# Altium PCB MB.PcbDoc (part 10 of 10)
Units mm, origin at the board's own origin, x right, y up, seen from the top; angles counter-clockwise.
Board outline 203 x 72 mm, 6 copper layers (Top Layer, Layer 3, Layer 1, Layer 2, Layer 4, Bottom Layer), stack 1.52 mm thick; 653 components, 568 nets, 2914 pads, 2399 vias.
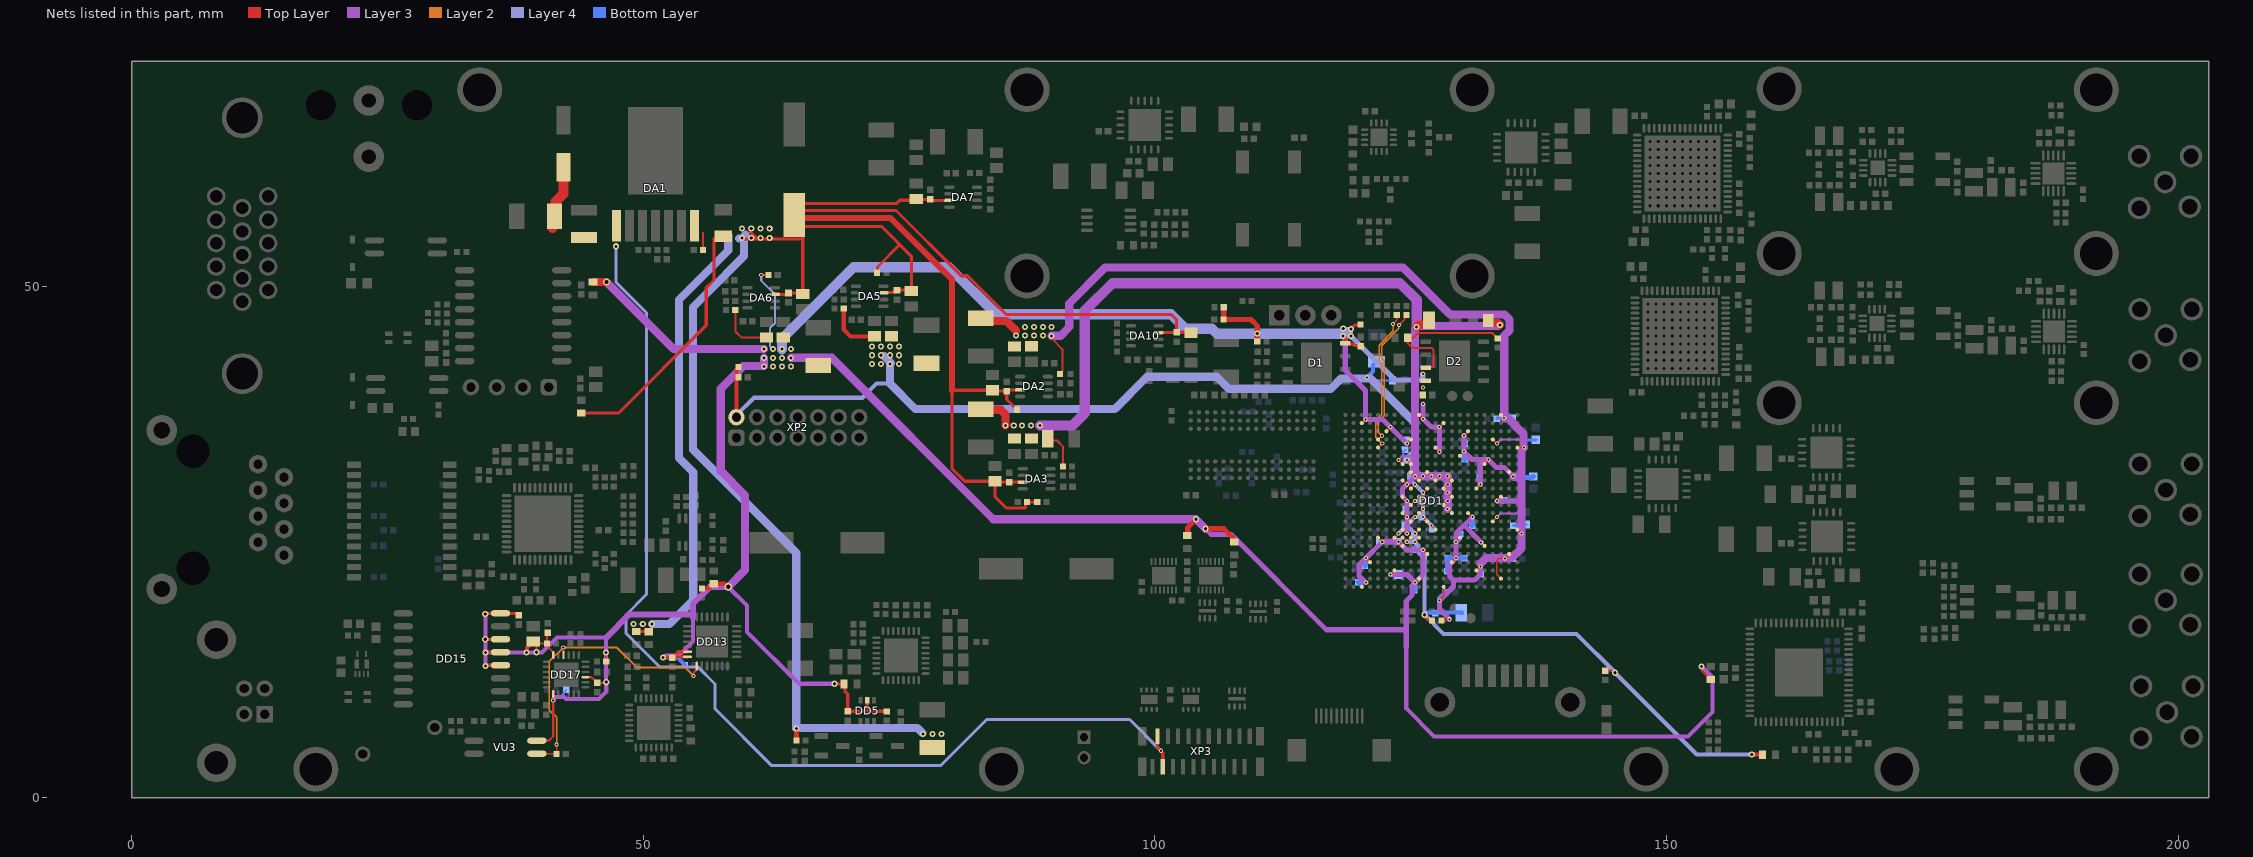
[diagram p13: the nets of this part, all layers, seen from the top]

## Via types
v1: diameter 0.8, hole 0.4, Top Layer to Bottom Layer, tented both sides, 1127 vias
v2: diameter 0.4, hole 0.2, Top Layer to Bottom Layer, tented both sides, 627 vias
v3: diameter 0.6, hole 0.3, Top Layer to Bottom Layer, tented both sides, 348 vias
v4: diameter 0.8, hole 0.4, Top Layer to Bottom Layer, 92 vias
v5: diameter 0.7, hole 0.4, Top Layer to Bottom Layer, tented both sides, 90 vias
v6: diameter 0.9, hole 0.5, Top Layer to Bottom Layer, 45 vias
v7: diameter 0.66, hole 0.4, Top Layer to Bottom Layer, 25 vias
v8: diameter 0.7, hole 0.3, Top Layer to Bottom Layer, 22 vias
v9: diameter 0.5, hole 0.2, Top Layer to Bottom Layer, 12 vias
v10: diameter 0.5, hole 0.3, Top Layer to Bottom Layer, 5 vias
v11: diameter 1, hole 0.5, Top Layer to Bottom Layer, 2 vias
v12: diameter 0.4, hole 0.2, Top Layer to Bottom Layer, 2 vias
v13: diameter 0.9, hole 0.4, Top Layer to Bottom Layer, tented both sides, 2 vias

## Nets (pads, with @x,y where several pads share a name; then routed paths per layer and width w, separated by ;. In a path a pad name is that pad's centre, name@x,y a point inside that pad or via, vN(x,y) a via of type N, cw(c..) or ccw(c..) an arc to the next point about the centre after c; other vN are vias at no path point) (continued)
VBUS_ISO: DD13.8 DD17.16 R168.2 VU3.3 | length 28.9
  Top Layer w0.125: VU3.3@39.6,4.315 41.51,4.315 R168.2@41.525,4.3 v2(41.525,5.2)
  Top Layer w0.2: v2(42.175,14.675) 42.194,14.656 42.194,13.956 DD17.16@42.2,13.95 ; v2(54.9,11.925) 54.938,11.963 54.938,12.25 55.225,12.536 DD13.8@55.225,12.875
  Layer 2 w0.125: v2(41.525,5.2) 41.525,7.875 40.825,8.575 40.825,13.325 v2(42.175,14.675)
  Layer 2 w0.2: v2(42.175,14.675) 42.19,14.69 47.41,14.69 49.35,12.75 54.075,12.75 v2(54.9,11.925)
VCC_5V0: C1.2 C2.2 C4.2 C8.2 C9.2 C10.2 C11.2 C12.2 C14.1 C15.2 C16.2 C17.2 C87.2 C88.2 DA1.7 DA2.3 DA3.3 DA5.3 DA6.3 DA7.3 DA10.3 L3.1 L10.1 L49.1 L62.1 R1.2 R2.2 R4.1 R6.2 R44.2 R49.1 | length 325.2
  Top Layer w0.2: R1.2@55.83,53.546 55.83,55.18 55.85,55.2
  Top Layer w0.3: L10.1@43.942,37.597 47.572,37.597 56.15,46.175 56.15,49.85 56.9,50.6 56.9,54.675 ; L3.1@49.3,16.235 50.52,16.235 L49.1@50.525,16.23 ; v3@59.8,54.625 62.35,54.625 65.3,54.625 ; 60.475,55.275 61.125,54.625 ; DA6.3@62.87,49.197 64.05,49.197 C16.2@64.187,49.334 65.493,49.334 C9.2@65.584,49.243 C14.1@65.584,55.05 ; C14.1@63.95,55.85 73.275,55.85 76.19,52.935 C8.2@76.19,49.52 76.099,49.611 C15.2@74.793,49.611 74.623,49.441 74.291,49.441 74.225,49.375 73.841,49.375 73.815,49.349 DA5.3@73.476,49.349 ; R2.2@72.849,51.31 72.884,51.345 72.884,51.884 75.038,54.037 ; C10.2@76.414,58.275 C10.2@76.539,58.4 ; C10.2@76.663,58.524 C10.2@76.539,58.4 ; C10.2@76.694,58.493 C17.2@78.06,58.493 78.17,58.383 DA7.3@79.905,58.383 ; R49.1@86.525,37.925 85.515,38.935 C11.2@85.515,39.739 ; DA2.3@86.832,39.874 85.65,39.874 C11.2@85.515,39.739 ; DA3.3@87.086,30.857 85.777,30.857 C12.2@85.769,30.849 84.463,30.849 C4.2@84.372,30.94 ; R4.1@88.494,28.896 R6.2@87.489,28.896 87.368,28.775 87.368,28.38 87.313,28.325 85.475,28.325 84.372,29.428 C4.2@84.372,30.94 ; DA10.3@100.348,45.466 102.095,45.466 C88.2@102.126,45.497 ; C87.2@103.523,45.454 103.48,45.497 C88.2@102.126,45.497 ; C10.2@76.539,58.4 75.075,58.4 74.775,58.1 65.65,58.1 64.75,57.2 C14.1@64.75,56.95 65.2,57.4 74.7,57.4 81.075,51.025 81.675,51.025 85.45,47.25 101.57,47.25 102.126,46.694 C88.2@102.126,45.497 ; C4.2@84.372,30.94 81.41,30.94 80.175,32.175 80.175,39.83 C1.2@84.118,39.83 84.209,39.739 C11.2@85.515,39.739
  Top Layer w0.5: v3(64.95,6.775) 64.955,6.77 R44.2@64.955,5.588
  Top Layer w0.6: C14.1@64.75,56.95 65.025,56.675 74.15,56.675 80.175,50.65 80.175,39.83
  Layer 4 w0.5: v3@77.275,6.325 77.275,6.3 77.325,6.25 v3(77.35,6.25)
  Layer 4 w0.8: v3(50.85,16.975) 52.55,16.975 54.845,19.27 ; 54.845,34.023 54.845,47.945 56.25,49.35 59.831,52.931 v3@59.831,54.881 ; 54.85,34.023 64.95,23.923 v3(64.95,6.775) ; 58.325,54.95 58.3,54.925 58.3,53.5 53.475,48.675 53.475,33.225 54.845,31.855 ; 59.35,54.65 v3(59.65,54.725) ; v3@59.662,54.713 v3@59.831,54.881 ; 60,55.05 v3@59.831,54.881 ; v3@65.027,6.825 76.775,6.825 v3@77.275,6.325 ; 54.845,19.27 54.85,19.275 ; 54.845,19.27 54.845,31.855 ; 54.845,31.855 54.85,31.85 ; 54.85,19.275 54.875,19.3 54.875,31.825 54.85,31.85 ; 54.85,19.275 54.85,31.85
  other v3: 78.25,6.25 79.15,6.25 49.05,16.975 49.95,16.975 60.55,54.725 61.45,54.725 62.35,54.725 59.65,55.625 60.55,55.625 61.45,55.625 62.35,55.625
VCC_IN: C3.1 C6.2 DA1.1 L58.2 XP3.2 XP3.3 | length 111.6
  Top Layer w0.3: XP3.2@100.261,6.034 100.261,4.914 v2(100.575,4.6) 100.575,4.573 100.761,4.387 XP3.3@100.761,3.034
  Top Layer w1: L58.2@41.132,55.705 41.132,56.85 41.45,57.168 41.45,58.275 42.2,59.025 C3.1@42.2,61.625
  Layer 4 w0.3: v3(47.325,53.9) 47.325,50.4 50.3,47.425 50.3,19.875 48.3,17.875 48.3,16.075 51.575,12.8 55.325,12.8 57,11.125 57,8.7 62.55,3.15 79.05,3.15 83.55,7.65 97.525,7.65 v2(100.575,4.6)
VDD_1V0: C31.2 C37.2 C42.2 C45.2 C47.2 C49.2 C51.2 C53.2 C55.2 C56.2 C60.2 C61.2 C63.2 DD1.G8 DD1.H9 DD1.H11 DD1.J8 DD1.J10 DD1.J12 DD1.J14 DD1.K13 DD1.L8 DD1.L14 DD1.M13 DD1.N8 DD1.N14 DD1.R8 L2.2 R9.2 | length 110.4
  Top Layer w0.2: C42.2@89.525,35.1 89.7,34.925 90.425,34.925 91.022,34.328 R9.2@91.022,32.394 ; v2(123.811,33.026) DD1.G8@124.212,32.625 ; DD1.R8@124.212,26.225 v2(124.613,25.824) ; DD1.N8@124.212,27.825 v2(124.613,27.424) ; DD1.L8@124.212,29.425 v2(124.613,29.024) ; DD1.J8@124.212,31.025 v2(124.613,30.624) ; DD1.H9@125.012,31.825 v2(125.413,31.424) ; DD1.J10@125.812,31.025 v2(126.213,31.426) ; DD1.H11@126.612,31.825 v2(127.013,31.424) ; DD1.J12@127.412,31.025 v2(127.813,31.426) ; DD1.M13@128.212,28.625 v2(128.613,29.026) ; DD1.K13@128.212,30.225 v2(128.613,30.626) ; v2(128.611,28.226) DD1.N14@129.012,27.825 ; v2(128.611,29.826) DD1.L14@129.012,29.425 ; v2(128.611,31.426) DD1.J14@129.012,31.025
  Top Layer w0.8: L2.2@82.975,37.985 83.041,37.919 84.931,37.919 85.4,37.45 v3(85.4,36.375) ; v3(125.576,46.024) 125.777,46.225 126.6,46.225 126.775,46.4 C45.2@126.775,46.675 ; C49.2@132.575,46.65 132.575,46.5 132.675,46.4 133.525,46.4 v3(133.7,46.225)
  Layer 3 w0.2: v2(123.811,33.026) 123.813,33.026 124.212,33.425 125.298,33.425 125.413,33.31
  Layer 3 w0.5: v2(124.613,25.824) v2(124.613,27.424) v2(124.613,29.024) 124.175,29.462 124.175,30.185 v2(124.613,30.624) v2(125.413,31.424)
  Layer 3 w0.6: v2@128.611,29.024 v2(128.613,29.026) ; v2(128.611,31.426) v2@128.613,31.424
  Layer 3 w0.8: 125.4,38.2 125.4,45.848 v3(125.576,46.024) ; 125.413,38.187 125.413,33.31 v2(125.413,31.424) v2@126.211,31.424 ; v3@125.576,46.101 133.576,46.101 v3(133.7,46.225) ; v2@126.216,31.424 v2(127.013,31.424) ; v2@127.013,31.426 v2(127.813,31.426) v2(128.611,31.426) ; v2(128.611,28.226) v2@128.611,29.024 ; v2(128.613,29.026) v2(128.613,30.626) v2@128.613,31.424
  Layer 3 w1: v3(88.775,36.375) 91.925,36.375 93.15,37.6 93.15,47.6 95.85,50.3 123.95,50.3 125.576,48.674 v3@125.576,46.101
  Bottom Layer w0.2: v2(123.811,33.026) 124.305,33.521 124.305,33.815 C63.2@124.49,34
  Bottom Layer w0.3: C60.2@124.49,28.215 124.613,28.092 v2(124.613,27.424) ; C56.2@124.494,26.65 124.613,26.531 v2(124.613,25.824)
  other v3: 86.2,36.375 87,36.375 87.875,36.375
VDD_1V8: C33.2 C39.2 C48.2 C50.2 C57.2 C59.2 C62.2 C64.2 C69.2 DD1.G9 DD1.K9 DD1.K11 DD1.L10 DD1.M9 DD1.N10 DD1.P9 DD1.P11 DD1.R10 DD1.R12 DD1.T7 DD1.T8 DD1.T9 DD1.T10 L4.2 L8.1 L46.1 R13.2 R20.1 R21.1 R23.2 R24.1 R25.1 XP2.2 | length 169.7
  Top Layer w0.2: DD1.T7@123.412,25.425 v2(123.813,25.826) ; DD1.T8@124.176,25.425 DD1.T8@124.212,25.425 v2@124.613,25.024 ; v2(124.611,25.024) DD1.T9@125.012,25.425 ; v2@124.611,33.025 DD1.G9@125.012,32.625 ; DD1.P9@125.012,27.025 v2(125.413,27.426) ; DD1.M9@125.012,28.625 v2(125.413,29.026) ; DD1.K9@125.012,30.225 v2(125.413,30.626) ; v2(125.411,25.024) DD1.T10@125.812,25.425 ; v2(125.411,25.824) DD1.R10@125.812,26.225 ; DD1.N10@125.812,27.825 v2(126.213,28.226) ; DD1.L10@125.812,29.425 v2(126.213,29.024) ; v2(126.211,27.426) DD1.P11@126.612,27.025 ; v2(126.211,29.824) DD1.K11@126.612,30.225 ; v3(126.332,17.895) 126.408,17.818 126.408,17.586 126.592,17.403 126.997,17.403 R24.1@127.075,17.325 ; v2(127.011,26.626) DD1.R12@127.412,26.225 ; R23.2@144,12.425 144.642,12.425 144.842,12.225 v3(144.95,12.225)
  Top Layer w0.4: XP2.2@59.1,37.2 59.1,41.9 R21.1@59.3,42.1 ; R13.2@69.586,47.812 69.586,45.764 70.251,45.099 C39.2@72.595,45.099 ; v3(158.326,4.225) L46.1@159.375,4.225
  Layer 4 w0.4: XP2.2@59.1,37.2 59.1,37.4 60.8,39.1 71.425,39.1 72.8,40.475 74.1,40.475 ; v2@123.813,25.821 v2(123.813,25.826) 124.613,26.626 ; v2(124.611,25.024) v2(125.411,25.024) ; v2(124.611,33.025) 125.113,32.522 125.113,31.957 124.829,31.673 124.829,31.211 v2(125.413,30.626) 126.211,29.829 v2(126.211,29.824) v2(126.211,27.426) ; v2(125.413,29.026) 125.416,29.024 v2(126.213,29.024) ; v2(127.011,26.626) v2(126.211,27.426) ; v3(158.326,4.225) 152.95,4.225 v3(144.95,12.225) 144.95,12.275 141.2,16.025 128.201,16.025 v3(126.332,17.895) 126.332,23.402 125.713,24.021 125.713,24.722 v2(125.411,25.024) ; 124.613,26.626 v2(125.413,27.426) v2(126.211,27.426) ; 124.613,26.626 125.411,25.829 v2(125.411,25.824) v2(125.411,25.024)
  Layer 4 w0.8: 73.538,43.162 v3@74.2,42.5 ; v3(74.1,42.4) 74.1,40.475 76.575,38 96.075,38 99.225,41.15 106.075,41.15 107.25,39.975 117.182,39.975 118.182,40.975 121.075,40.975 125.4,36.65 125.4,33.814 v2(124.611,33.025)
  Bottom Layer w0.2: v2(120.725,41.1) 121.025,40.8 L8.1@123.195,40.8
  Bottom Layer w0.4: v2(120.725,41.1) 121.309,41.684 121.309,42.284 C48.2@121.65,42.625 ; v2(125.411,25.024) 125.51,24.924 C62.2@125.51,24.225 ; v3(126.332,17.895) 126.386,17.895 126.597,18.106 129.994,18.106 C50.2@130.025,18.075
  other v3: 72.35,42.4 73.225,42.4 74.975,42.4 72.35,43.25 73.225,43.25 74.1,43.25 74.975,43.25 72.35,44.1 73.225,44.1 74.1,44.1 74.975,44.1
VDD_2V5: C30.2 C36.2 C134.2 C135.2 C138.2 C139.2 C142.2 C143.2 C145.2 C147.2 C148.2 C149.2 C150.2 C151.2 C152.2 C153.2 C154.2 C156.2 C157.2 C158.2 C159.2 C160.2 C161.2 DD1.A20 DD1.AA20 DD1.AB13 DD1.C16 DD1.D19 DD1.E22 DD1.F15 DD1.G18 DD1.H21 DD1.K17 DD1.L20 DD1.N16 DD1.P19 DD1.R22 DD1.T15 DD1.U18 DD1.V21 DD1.W14 DD1.Y17 L1.2 R7.2 R61.2 | length 157.6
  Top Layer w0.125: v2(127.817,19.292) 128.212,19.687 DD1.AB13@128.212,20.625 ; DD1.AA20@133.807,21.425 133.4,21.832 133.4,23.161 133.651,23.413 134.197,23.413 v2(134.211,23.399)
  Top Layer w0.2: v3(89.9,45.15) 89.9,44.9 90.95,43.85 90.95,41.728 90.922,41.7 90.922,41.611 R7.2@90.722,41.411 ; R61.2@128,17.325 128.621,17.325 128.746,17.45 v2(128.8,17.45) ; DD1.W14@129.012,23.025 v2(129.413,23.426) ; v2(129.425,25) 129.425,25.019 129.812,25.406 DD1.T15@129.812,25.425 ; DD1.F15@129.812,33.425 v2(130.213,33.826) ; v2@130.213,35.425 DD1.C16@130.612,35.825 ; DD1.N16@130.612,27.825 v2(131.013,27.424) ; DD1.Y17@131.412,22.225 v2(131.813,22.626) ; DD1.K17@131.412,30.225 v2(131.813,30.626) ; v2(131.885,24.952) DD1.U18@132.212,24.625 ; DD1.G18@132.212,32.625 132.212,32.643 132.613,33.045 v2(132.613,33.063) ; DD1.P19@133.012,27.025 v2(133.413,27.426) ; DD1.D19@133.012,35.025 v2(133.413,34.624) ; v2(133.411,29.024) DD1.L20@133.812,29.425 ; DD1.A20@133.812,37.425 v2(134.132,37.105) ; v2(134.211,23.399) 134.211,23.424 DD1.V21@134.612,23.825 ; DD1.H21@134.612,31.825 v2(135.013,31.424) ; DD1.R22@135.412,26.225 v2(135.813,25.824) ; DD1.E22@135.412,34.225 v2(136.075,34.225)
  Top Layer w0.8: L1.2@82.975,46.875 83.25,46.6 85.475,46.6 86.425,45.65
  Layer 3 w0.2: v2(133.413,27.426) 133.762,27.775 135.813,27.775 ; v2(133.413,34.624) 133.813,35.024 135.179,35.024 135.19,35.034 135.981,35.034 136.025,34.99
  Layer 3 w0.5: v2(128.8,17.45) 127.817,18.433 v2(127.817,19.292) 129.189,20.664 129.189,21.274 ; v2(130.213,35.424) v2(130.213,35.424) v2(130.213,33.826) 130.977,33.063 131.795,33.063 ; v2(131.013,27.424) 130.219,26.629 ; v2(131.813,22.626) 131.813,21.846 131.241,21.274 129.189,21.274 ; v2(131.813,30.626) 131.795,30.644 131.795,33.063 ; v2(131.885,24.952) 131.885,24.964 130.219,26.629 ; v2(133.411,29.024) 135.8,29.024 ; v2(135.013,31.424) 134.137,32.3 133.325,32.3 132.613,33.011 v2(132.613,33.063) 131.795,33.063 ; 129.189,21.274 128.775,21.687 128.775,22.788 v2(129.413,23.426) 129.413,24.988 v2(129.425,25) 129.425,25.835 130.219,26.629
  Layer 3 w0.8: v3(89.9,45.15) 90.775,45.15 91.625,46 91.625,48.325 95.125,51.825 124.25,51.825 128.85,47.225 134.181,47.225 134.65,46.756 134.65,45.675 134.132,45.157 v2(134.132,37.105) 134.495,37.105 136.025,35.575 136.025,34.99 v2@136.025,34.275 ; 131.813,22.88 132.357,23.424 134.186,23.424 v2(134.211,23.399) ; v2@134.211,23.424 134.856,23.424 135.813,24.381 v2(135.813,25.824) 135.813,27.775 135.813,33.963 v2(136.075,34.225) ; v2@135.062,31.375 135.733,31.375
  Bottom Layer w0.3: v2(131.813,22.626) 131.825,22.615 C134.2@131.825,21.87 ; C138.2@133.383,37.037 133.45,37.105 v2(134.132,37.105) 134.92,37.105 C142.2@134.95,37.135 ; C150.2@133.509,23.37 133.537,23.399 v2(134.211,23.399) 134.951,23.399 C143.2@134.98,23.37 ; C152.2@135.024,26.61 136.139,26.61 C160.2@136.25,26.72 ; 135.569,26.613 135.569,26.068 v2(135.813,25.824) ; v2(136.075,34.225) 136.075,34.94 C149.2@136.025,34.99 137.215,34.99 C161.2@137.225,35
  Bottom Layer w0.5: v2(127.817,19.292) 127.817,19.497 C153.2@128.413,20.092 ; C148.2@128.575,22.135 128.588,22.148 128.588,23.4 C135.2@128.6,23.413 128.614,23.426 v2(129.413,23.426) 130.216,23.426 C139.2@130.225,23.435 ; v2(129.425,25) 129.742,25.317 129.742,25.695 C147.2@129.812,25.765 ; v2(130.213,33.826) 130.213,33.147 C156.2@130.275,33.085 ; v2(130.213,35.424) 130.213,34.959 130.215,34.956 130.215,34.67 C159.2@130.285,34.6 ; C158.2@131,26.61 131.013,26.624 v2(131.013,27.424) ; C151.2@131.754,31.303 131.795,31.261 131.795,30.645 v2(131.813,30.626) ; v2(133.411,29.024) 133.752,29.024 133.759,29.03 134.045,29.03 C157.2@134.115,29.1 ; v2(135.013,31.424) 135.462,31.424 C154.2@135.825,31.061 136.079,31.315 136.877,31.315 C145.2@136.975,31.413
  other v3: 86.425,45.175 87.3,45.175 88.175,45.175 89.05,45.175 89.9,46 87.3,46.025 88.175,46.025 89.05,46.025
VDD_3V3: C5.2 C32.2 C34.2 C38.2 C40.2 C66.2 C68.2 C71.2 C75.2 C81.2 C111.2 C132.2 C133.2 C136.2 C140.2 C144.2 C327.2 C346.2 D1.8 D2.7 D2.8 DD1.A10 DD1.AA10 DD1.AB3 DD1.B3 DD1.B13 DD1.C6 DD1.D9 DD1.E12 DD1.T5 DD1.U8 DD1.V11 DD1.W4 DD1.Y7 DD5.5 DD13.6 DD13.7 DD15.12 DD15.13 DD15.14 DD15.16 DD17.1 DD17.9 DD17.18 L5.2 L9.1 L11.1 L12.1 L13.1 L17.1 L48.1 L60.1 R12.1 R15.2 R22.2 R26.1 R27.2 R28.2 R31.1 R32.1 R37.2 R160.2 R162.2 R163.2 R165.2 VU3.4 | length 439.1
  Top Layer w0.2: v3(39.575,14.225) 39.575,14.95 39.425,15.1 R165.2@40.575,15.1 ; VU3.4@39.6,5.585 40.785,5.585 41.2,6 v2(41.2,9.525) DD17.1@41.2,10.15 ; C111.2@40.65,16.14 40.575,16.065 R165.2@40.575,15.1 ; DD17.18@41.2,13.95 41.2,14.223 41.185,14.238 41.185,14.24 40.762,14.663 40.762,14.913 R165.2@40.575,15.1 ; DD17.9@44.35,11.8 44.875,11.8 44.95,11.725 45.01,11.725 C32.2@45.5,11.235 46.31,11.235 v3(46.375,11.3) ; R163.2@46.375,13.325 v3@46.375,14.175 ; R15.2@58.98,47.66 59,47.64 59,45.575 59.58,44.995 C40.2@62.036,44.995 ; v2(61.525,51.1) 61.537,51.112 R28.2@62.242,51.112 ; DD1.AB3@120.212,20.625 v2(120.613,21.026) ; DD1.B3@120.212,36.625 DD1.B3@120.212,36.625 120.575,36.986 v2(120.577,36.986) ; v2(120.611,23.426) DD1.W4@121.012,23.025 ; DD1.T5@121.81,25.423 v2(122.212,25.022) ; DD1.C6@122.612,35.825 v2(123.013,36.226) ; v2(123.011,21.824) DD1.Y7@123.412,22.225 ; v2(123.813,25.028) DD1.U8@124.214,24.627 ; v2(124.611,34.624) DD1.D9@125.012,35.025 ; v2(125.423,21.029) 125.812,21.418 DD1.AA10@125.812,21.425 ; DD1.A10@125.812,37.425 v2(126.213,37.024) ; v2(126.213,24.228) DD1.V11@126.614,23.827 ; D2.7@126.468,42.037 126.525,42.094 127.176,42.094 127.225,42.143 127.225,43.8 127.075,43.95 125.175,43.95 124.705,44.42 L9.1@124.705,44.95 125.238,44.95 125.713,45.425 132.97,45.425 R26.1@133.495,44.9 ; DD1.E12@127.412,34.225 v2(127.813,33.824) ; v2(127.811,36.224) DD1.B13@128.212,36.625 ; v3(153.425,12.85) 153.454,12.821 153.454,12.431 154.003,11.882 154.003,11.807 154.248,11.562 L48.1@154.323,11.562
  Top Layer w0.3: v3(34.55,15.5) 34.556,15.494 DD15.14@36.043,15.494 ; v3(34.55,17.975) 34.631,17.975 34.69,18.034 DD15.16@36.043,18.034 37.671,18.034 C346.2@37.846,17.859 ; v3(34.575,12.9) 34.629,12.954 DD15.12@36.043,12.954 ; v3(34.575,14.2) 34.599,14.224 DD15.13@36.043,14.224 ; v3(51.925,13.725) 51.94,13.71 C5.2@52.825,13.71 ; DD13.7@54.325,13.775 52.89,13.775 C5.2@52.825,13.71 ; DD13.6@54.325,14.275 53.39,14.275 C5.2@52.825,13.71 ; v3(68.675,11.15) 68.699,11.126 L60.1@69.605,11.126 69.693,11.038 69.693,10.432 69.977,10.148 C81.2@69.977,8.461 71.877,8.461 ; DD5.5@71.882,9.534 71.882,8.466 71.877,8.461 ; R37.2@73.787,8.451 73.777,8.461 71.877,8.461 ; v3(118.375,45.125) 118.6,44.9 D1.8@118.6,44.42 118.666,44.354 119.321,44.354 119.45,44.225 120.015,44.225 C66.2@120.125,44.115 ; v3@119.15,45.9 119.325,46.075 119.4,46.075 119.519,46.194 119.994,46.194 R12.1@120.075,46.275
  Top Layer w0.4: v3(38.6,14.2) 38.624,14.224 38.624,14.649 38.8,14.825 38.8,14.975 39.1,15.275 C327.2@39.25,15.275 ; R162.2@55.75,20.475 56.421,20.475 56.655,20.709 56.655,20.775 56.8,20.92 57.924,20.92 58.219,20.625 v5(58.3,20.625)
  Top Layer w0.5: L12.1@103.161,25.632 103.209,25.68 103.209,26.409 v3(104.025,27.225) ; v3(104.95,26.3) 106.725,26.3 107.563,25.462 107.563,25.084 107.658,24.989 L13.1@107.733,24.989 ; R32.1@106.725,47.95 106.725,46.766 R31.1@106.7,46.741 109.384,46.741 110,46.125 v3(110,45.363) R22.2@110,44.6
  Top Layer w0.8: L11.1@45.085,50.414 v5(46.389,50.414)
  Layer 3 w0.4: v3(34.55,17.975) 34.575,17.95 v3(34.575,14.2) ; v3(34.575,12.9) v3(34.575,14.2) ; v2(41.2,9.525) 41.2,9.603 41.434,9.838 42.27,9.838 42.457,9.65 45.675,9.65 46.375,10.35 v3(46.375,11.3) 46.36,11.315 v3(46.36,14.19) 46.36,15.66 41.56,15.66 40.1,14.2 v3(38.6,14.2) v3(34.575,14.2) ; v3(51.925,13.725) 51.979,13.725 52.179,13.925 53.475,13.925 54.85,15.3 54.85,17.625 ; v5(58.3,20.625) 60.15,18.775 60.15,16.2 65.2,11.15 v3(68.675,11.15) ; 124.561,14.709 124.561,8.714 127.275,6 152.1,6 154.475,8.375 154.475,11.8 v3(153.425,12.85)
  Layer 3 w0.5: v3(104.95,26.3) 105.5,25.75 107.425,25.75 116.75,16.425 124.561,16.425 ; 118.6,44.9 118.6,41.775 120.577,39.798 v2(120.577,36.986) 122.254,36.986 v2(123.013,36.226) 124.611,34.629 v2(124.611,34.624) ; v2(120.613,21.026) 119.95,21.69 119.95,22.766 v2(120.611,23.426) 120.616,23.426 v2(122.212,25.022) 123.806,25.022 v2(123.813,25.028) 124.613,24.228 v2(126.213,24.228) 126.213,21.818 v2(125.423,21.029) ; v2(123.011,21.824) 124.629,21.824 v2(125.423,21.029) ; 124.561,14.709 124.561,16.425 ; v2@126.213,38.472 v2(126.213,37.024) 127.014,36.224 v2(127.811,36.224) 127.813,36.221 v2(127.813,33.824) ; 124.561,16.425 124.561,19.249 125.137,19.825 125.137,20.743 v2(125.423,21.029)
  Layer 3 w0.6: 46.36,15.66 48.6,17.9 54.85,17.9 ; 54.85,17.625 54.85,18.95 56.525,20.625 v5(58.3,20.625)
  Layer 3 w0.8: v5(46.389,50.414) 52.953,43.85 v3(61.8,43.85) ; v5(58.3,20.625) 59.95,22.275 59.95,29.55 57.575,31.925 57.575,40 59.775,42.2 61.775,42.2 61.8,42.225 v3(61.8,43) ; v3(64.425,43) 68.425,43 84.2,27.225 v3(104.025,27.225) v3(104.95,26.3)
  Layer 4 w0.2: v2(61.525,51.1) 61.525,50.542 62.87,49.197 62.87,46.37 62.375,45.875 62.375,44.15 v3(62.675,43.85)
  Layer 4 w0.5: v3@119.15,45.075 119.225,45 119.275,45 123.45,40.825 126.175,40.825 v2(126.175,41.425)
  Layer 4 w1: v3(63.55,43.85) 63.55,44.858 70.542,51.85 79.875,51.85 84.475,47.25 95.027,47.25 101.57,47.25 102.97,45.85 105.573,45.85 106.06,45.363 v3(110,45.363) 118.713,45.363 118.875,45.525
  Bottom Layer w0.2: v2(41.2,9.525) 41.444,9.769 41.787,9.769 42.245,10.227 42.245,10.33 C38.2@42.465,10.55
  Bottom Layer w0.4: v3(51.925,13.725) 53.325,13.725 R160.2@54.075,12.975
  Bottom Layer w0.5: C136.2@119.858,21.082 119.914,21.026 v2(120.613,21.026) ; C132.2@120.519,22.686 120.589,22.756 120.589,23.027 120.611,23.049 v2(120.611,23.426) ; v2(123.011,21.824) 123.773,21.824 C144.2@123.775,21.825 ; C133.2@125.335,20.275 125.405,20.345 125.405,20.62 125.423,20.638 v2(125.423,21.029) ; v2(126.213,24.228) 126.215,24.226 126.215,23.595 C75.2@126.25,23.56
  other v2: 126.199,38.486 126.2,40.1
  other v3: 61.8,42.15 62.675,42.15 63.55,42.15 64.425,42.15 62.675,43 63.55,43 64.425,43.85 119.15,45.125 119.15,45.825 118.4,45.85
VMODE0: DD1.D5 R158.2 | length 13.8
  Top Layer w0.125: v2(123.85,46.2) 124.411,46.761 124.411,47.011 R158.2@124.575,47.175
  Top Layer w0.2: DD1.D5@121.812,35.025 v2(122.175,35.388)
  Layer 2 w0.125: v2(122.175,35.388) 121.812,35.75 121.812,36.789 122.387,37.364 122.387,42.714 122.162,42.939 122.162,44.186 123.85,45.874 v2(123.85,46.2)
VMODE1: DD1.E5 R159.2 | length 14.4
  Top Layer w0.125: v2(123.275,46.325) 123.625,46.675 R159.2@123.625,47.175
  Top Layer w0.2: DD1.E5@121.812,34.225 v2(122.213,34.626)
  Layer 2 w0.125: v2(122.213,34.626) 121.587,35.253 121.587,36.882 122.162,37.457 122.162,42.5 121.9,42.762 121.9,44.25 123.275,45.625 v2(123.275,46.325)
pads on no net: BQ1.2 BQ1.4 BQ2.2 BQ2.4 DA13.2 DA13.4 DA13.5 DA13.6 DA13.9 DA13.10 DA14.18 DA15.18 DA16.2 DA16.4 DA16.5 DA16.6 DA16.9 DA16.10 DA17.2 DA17.4 DA17.5 DA17.6 DA17.9 DA17.10 DA18.6 DA18.7 DA19.6 DA19.7 DA20.2 DA20.4 DA20.5 DA20.6 DA20.8 DA20.9 DA20.11 DA20.12 DA21.2 DA21.4 DA21.5 DA21.6 DA21.9 DA21.10 DD1.A7 DD1.A8 DD1.A11 DD1.AA1 DD1.AA2 DD1.AA3 DD1.AA8 DD1.AA9 DD1.AA18 DD1.B7 DD1.B9 DD1.B10 DD1.B11 DD1.C4 DD1.C7 DD1.C8 DD1.C10 DD1.C12 DD1.C13 DD1.D7 DD1.D8 DD1.D10 DD1.D12 DD1.D13 DD1.D15 DD1.E8 DD1.E9 DD1.E10 DD1.E13 DD1.E14 DD1.E15 DD1.E16 DD1.F8 DD1.F9 DD1.F12 DD1.F16 DD1.F17 DD1.F19 DD1.G6 DD1.G15 DD1.G16 DD1.G17 DD1.G19 DD1.G20 DD1.G21 DD1.H15 DD1.H17 DD1.H18 DD1.H19 DD1.H20 DD1.L11 DD1.L16 DD1.M1 DD1.M2 DD1.M12 DD1.N2 DD1.N3 DD1.N15 DD1.N19 DD1.N20 DD1.P1 DD1.P2 DD1.P13 DD1.P15 DD1.P16 DD1.R1 DD1.R3 DD1.R6 DD1.R7 DD1.R14 DD1.R15 DD1.R16 DD1.R19 DD1.T1 DD1.T2 DD1.T3 DD1.T4 DD1.T6 DD1.T17 DD1.T19 DD1.U1 DD1.U2 DD1.U4 DD1.U5 DD1.U6 DD1.U7 DD1.U9 DD1.U12 DD1.U14 DD1.U19 DD1.V2 DD1.V4 DD1.V10 DD1.V12 DD1.V15 DD1.W1 DD1.W2 DD1.W3 DD1.W10 DD1.W11 DD1.W12 DD1.W15 DD1.W17 DD1.W18 DD1.Y1 DD1.Y3 DD1.Y10 DD1.Y15 DD1.Y18 DD1.Y20 DD1.Y21 DD2.7 DD2.13 DD3.7 DD3.13 DD6.J1 DD6.J9 DD6.L1 DD6.L9 DD6.M7 DD7.13 DD7.43 DD7.47 DD9.6 DD9.7 DD12.62 DD12.63 DD12.65 DD12.66 DD13.1 DD13.2 DD13.10 DD13.12 DD13.13 DD13.14 DD13.15 DD13.16 DD13.17 DD13.18 DD13.19 DD13.20 DD13.21 DD13.22 DD13.23 DD13.27 DD14.3 DD14.6 DD14.15 DD14.22 DD16.1 DD16.2 DD16.3 DD16.8 DD16.10 DD16.11 DD16.14 DD16.26 DD16.27 DD16.30 DD16.31 DD16.32 DD17.6 DD17.7 DD17.8 DD17.12 DD17.15 DD17.23 G1.1 T1.2 T2.2 VD1.2 VD2.2 VD3.4 XP1.0 XP2.12 XP2.14 XP3.0 XP4.0 XS1.0 XS3.6 XS3.7 XS3.8 XS3.9 XS3.10 Z1.2 Z1.3 Z1.6 Z1.7 Z4.1 Z4.2 Z4.7 Z4.8

## Polygon pours and split planes (outlines as drawn)
GND on Layer 4 "GND_L05_P003" (solid, remove dead copper, pour order 3): 0.05,71.98 0.055,71.975 203,71.975 203,0.05 202.95,0.1 0.05,0.1
ANALOG_3V8 on Layer 4 "ANALOG_3V8_L05_P000" (solid, pour order 0): 80.4,67.525 83.875,67.525 86.475,64.925 91.55,64.925 91.55,61.975 91.6,61.925 85,61.925 84.3,62.625 80.4,62.625
no net on Top Solder (solid): 202 vertices, not listed, extent 14.949,-0.2 194.75,72
no net on Bottom Solder (solid): 201 vertices, not listed, extent 14.949,-0.2 194.75,72
GND on Layer 3 "GND_L02_P004" (solid, remove dead copper, pour order 4): 0.05,71.98 0.055,71.975 203,71.975 203,0.05 202.95,0.1 0.05,0.1
GND on Bottom Layer "GND_L06_P002" (solid, remove dead copper, pour order 2): 0.05,71.98 0.055,71.975 203,71.975 203,0.05 202.95,0.1 0.05,0.1
GND on Top Layer "GND_L01_P001" (solid, remove dead copper, pour order 1): 0.05,71.98 0.055,71.975 203,71.975 203,0.05 202.95,0.1 0.05,0.1

## Keep-outs
Keep-Out Layer:
  the board outline again, w0.1

## Other copper
Top Layer:
  rectangle net VDD_3V3: 125.95,38.275 126.425,42.275
  rectangle net VDD_3V3: 118.05,44.75 119.475,46.225
  rectangle net VDD_3V3: 61.375,41.475 66.025,44.55
  rectangle net VDD_1V0: 84.975,34.825 90,36.85
  rectangle net VDD_1V8: 71.925,41.725 76.575,44.8
  region net VDD_2V5: 90.325,46.475 85.6,46.475 85.6,44.475 90.325,44.475
  rectangle net DDR_1V5: 99.95,38.525 104.175,41.475
  rectangle net GND: 164.876,29.325 166.475,32.75
  rectangle net GND: 164.852,20.775 166.502,24.452
  rectangle net GND: 148.821,31.575 150.325,35.575
  rectangle net GND: 98.2,58.475 99.85,64.35
  rectangle net VCC_5V0: 55.125,54.225 65.825,56.275
  rectangle net ANALOG_3V8: 81.725,62.625 85.2,67.525
  rectangle net NetL58_1: 36.55,57.55 38.7,63.45
  rectangle net VCC_IN: 40.6,53.5 47.825,56.1
  rectangle net VCC_5V0: 77.025,5.6 79.425,6.55
  rectangle net VCC_5V0: 48.725,16.325 51.125,17.275
  rectangle net CHP: 81.275,11.3 82.575,17.25
  rectangle net ANALOG_3V8: 133.9,54.35 135.325,55.825
  rectangle net ANALOG_3V8: 141.1,25.75 142.525,27.225
  rectangle net ANALOG_3V8: 155.15,26.35 156.3,32.175
  rectangle net ANALOG_3V8: 90.05,59.5 91.55,64.8
  pour cut-out: 115.8,38 115.8,31 103.2,31 103.2,38
  pour cut-out: 118.3,37.85 135.7,37.85 135.7,20.25 118.3,20.25
  pour cut-out: 189.455,10.103 189.455,6.232 182.463,6.232 182.463,10.103
  pour cut-out: 190.405,31.503 190.405,27.632 183.413,27.632 183.413,31.503
  pour cut-out: 190.392,20.721 190.392,16.85 183.4,16.85 183.4,20.721
  pour cut-out: 163.618,50.952 169.018,50.952 169.018,41.265 163.618,41.265
  pour cut-out: 163.425,66.138 168.825,66.138 168.825,56.45 163.425,56.45
  pour cut-out: 177.53,46.836 184.73,46.836 184.73,42.885 177.53,42.885
  pour cut-out: 177.475,61.925 184.675,61.925 184.675,57.975 177.475,57.975
Layer 3:
  rectangle net VDD_3V3: 118.05,44.75 119.475,46.225
  rectangle net VDD_3V3: 61.375,41.475 66.025,44.25
  rectangle net VDD_1V0: 84.975,35.875 90,36.9
  region net VDD_2V5: 90.325,46.475 85.6,46.475 85.6,44.475 90.325,44.475
  rectangle net DDR_1V5: 99.95,38.525 104.375,40.35
  rectangle net NetL58_1: 21.525,57.325 38.825,64.375
  pour cut-out: 190.423,31.521 190.423,27.65 183.431,27.65 183.431,31.521
  pour cut-out: 189.442,10.103 189.442,6.232 182.449,6.232 182.449,10.103
  pour cut-out: 190.392,20.8 190.392,16.85 183.4,16.85 183.4,20.8
  pour cut-out: 163.618,50.952 169.018,50.952 169.018,41.265 163.618,41.265
  pour cut-out: 163.425,66.138 168.825,66.138 168.825,56.45 163.425,56.45
  pour cut-out: 177.53,46.836 184.73,46.836 184.73,42.885 177.53,42.885
  pour cut-out: 177.475,61.925 184.675,61.925 184.675,57.975 177.475,57.975
Layer 1:
  pour cut-out: 190.405,31.503 190.405,27.632 183.413,27.632 183.413,31.503
  pour cut-out: 189.442,10.103 189.442,6.232 182.449,6.232 182.449,10.103
  pour cut-out: 190.392,20.8 190.392,16.85 183.4,16.85 183.4,20.8
  pour cut-out: 163.618,50.952 169.018,50.952 169.018,41.265 163.618,41.265
  pour cut-out: 163.425,66.138 168.825,66.138 168.825,56.45 163.425,56.45
  pour cut-out: 177.53,46.836 184.73,46.836 184.73,42.885 177.53,42.885
  pour cut-out: 177.475,61.925 184.675,61.925 184.675,57.975 177.475,57.975
Layer 2:
  pour cut-out: 190.405,31.503 190.405,27.632 183.413,27.632 183.413,31.503
  pour cut-out: 189.442,10.103 189.442,6.232 182.449,6.232 182.449,10.103
  pour cut-out: 190.392,20.8 190.392,16.85 183.4,16.85 183.4,20.8
  pour cut-out: 163.618,50.952 169.018,50.952 169.018,41.265 163.618,41.265
  pour cut-out: 163.425,66.138 168.825,66.138 168.825,56.45 163.425,56.45
  pour cut-out: 177.53,46.836 184.73,46.836 184.73,42.885 177.53,42.885
  pour cut-out: 177.475,61.925 184.675,61.925 184.675,57.975 177.475,57.975
Layer 4:
  rectangle net VDD_3V3: 125.95,38.275 126.425,42.275
  rectangle net VDD_3V3: 118.05,44.75 119.475,46.225
  rectangle net VDD_3V3: 61.375,41.475 66.025,44.25
  rectangle net VDD_1V8: 71.925,41.725 76.575,44.5
  rectangle net VCC_5V0: 55.125,54.25 65.825,56.3
  rectangle net VCC_5V0: 77.025,5.6 79.425,6.55
  rectangle net VCC_5V0: 48.725,16.325 51.125,17.275
  rectangle net ANALOG_3V8: 133.9,54.35 135.325,55.825
  rectangle net ANALOG_3V8: 141.1,25.75 142.525,27.225
  rectangle net ANALOG_3V8: 155.175,26.75 156.325,31.775
  pour cut-out: 190.405,31.503 190.405,27.632 183.413,27.632 183.413,31.503
  pour cut-out: 189.455,10.103 189.455,6.232 182.463,6.232 182.463,10.103
  pour cut-out: 190.392,20.8 190.392,16.85 183.4,16.85 183.4,20.8
  pour cut-out: 163.618,50.952 169.018,50.952 169.018,41.265 163.618,41.265
  pour cut-out: 163.425,66.138 168.825,66.138 168.825,56.45 163.425,56.45
  pour cut-out: 177.53,46.836 184.73,46.836 184.73,42.885 177.53,42.885
  pour cut-out: 177.475,61.925 184.675,61.925 184.675,57.975 177.475,57.975
Bottom Layer:
  pour cut-out: 190.405,31.503 190.405,27.632 183.413,27.632 183.413,31.503
  pour cut-out: 189.442,10.103 189.442,6.232 182.449,6.232 182.449,10.103
  pour cut-out: 190.392,20.8 190.392,16.85 183.4,16.85 183.4,20.8
  pour cut-out: 163.618,50.952 169.018,50.952 169.018,41.265 163.618,41.265
  pour cut-out: 163.425,66.138 168.825,66.138 168.825,56.45 163.425,56.45
  pour cut-out: 177.53,46.836 184.73,46.836 184.73,42.885 177.53,42.885
  pour cut-out: 177.475,61.925 184.675,61.925 184.675,57.975 177.475,57.975

## Silkscreen, mask and mechanical layers (free items; w line width, h text height)
Top Solder:
  lines w3: 33.683,67.734 ccw(c34,69.2) 35.424,69.671 ; 192.6,2.95 193,3.35
Bottom Solder:
  lines w3: 33.555,67.768 ccw(c34,69.2) 35.395,69.751
Экран:
  lines w0.2: 16.335,16.653 ccw(c17.2,14.85) 15.2,14.85 15.2,0 86.077,0 ccw(c85,2.8) 87.277,4.754 ; 16.347,16.662 ccw(c15.2,18.3) 17.2,18.3 17.2,59 29.2,59 ; 18.2,7.2 ccw(c20.2,7.2) 19.355,5.387 ; 18.21,7.2 18.204,13.365 cw(c20.097,13.365) 19.011,14.916 ; 19.065,14.947 ccw(c18.2,16.75) 20.2,16.75 20.2,54 cw(c22.2,54) 22.2,56 34.2,56 34.2,64.8 cw(c36.2,64.8) 35.355,66.613 ; 19.15,15.004 19.2,15.032 ; 19.326,5.402 cw(c18,2.8) 20.578,4.171 ; 20.587,4.155 ccw(c22.4,5) 22.4,3 ; 22.259,3 80.5,3 ccw(c80.5,6) 83.5,6 83.5,10.5 cw(c89.5,10.5) 89.5,16.5 ; 29.1,59 ccw(c29.1,61) 31.1,61 31.1,72 194.8,72 194.8,0 146.719,0 ; 35.371,66.622 ccw(c34,69.2) 36.602,67.874 ; 36.587,67.845 cw(c38.4,67) 38.4,69 83,69 cw(c83,66) 86,66 86,54.97 cw(c83,54.97) 85.215,52.947 ; 85.232,52.963 ccw(c87.5,51) 89.359,48.645 ; 87.268,4.746 cw(c89.5,6.75) 86.5,6.75 86.5,10.5 cw(c89.5,10.5) 89.5,13.5 143.5,13.5 cw(c143.5,10.5) 146.5,10.5 146.5,6.77 cw(c143.5,6.77) 145.715,4.747 ; 89.214,48.533 cw(c91.056,46.259) 91.056,49.185 127.03,49.494 ; 89.375,16.5 143.5,16.5 cw(c143.5,10.5) 149.5,10.5 149.5,6 ccw(c152.5,6) 152.5,3 168,3 ccw(c168,6) 171,6 171,34.109 ccw(c168,34.109) 168,37.109 ; 92,52.3 cw(c92,55.3) 89,55.3 89,66 cw(c92,66) 92,69 126.5,69 cw(c126.5,66) 129.5,66 129.5,55.5 cw(c126.5,55.5) 126.5,52.5 ; 92,52.306 126.5,52.487 ; 127.03,49.5 cw(c127.03,46.5) 129.053,48.715 ; 129.037,48.732 ccw(c131,51) 133.231,53.005 ; 133.235,53.008 cw(c135.5,54.975) 132.5,54.975 132.5,66 cw(c135.5,66) 135.5,69 156.5,69 cw(c156.5,66) 159.5,66 159.5,57.15 cw(c156.5,57.15) 158.68,55.089 ; 145.732,4.763 ccw(c148,2.8) 146.719,0.087 ; 158.674,55.095 ccw(c161,53.2) 158.687,51.29 ; 158.694,51.297 cw(c156.5,49.25) 159.5,49.222 ; 158.715,40.547 ccw(c156.5,42.57) 159.5,42.57 159.5,49.222 ; 158.732,40.563 ccw(c161,38.6) 163.005,36.369 ; 163.008,36.365 cw(c164.975,34.1) 164.975,37.1 168,37.1 ; 177,37.1 188.8,37.1 cw(c188.8,34.1) 191.8,34.1 191.8,7.225 ; 177,37.109 ccw(c177,34.109) 174,34.109 174,6 ccw(c177,6) 177,3 187.6,3 ccw(c187.6,5) 189.413,4.155 ; 189.398,4.126 cw(c192,2.8) 190.629,5.378 ; 189.413,67.845 ccw(c187.6,67) 187.6,69 165.5,69 ccw(c165.5,66) 162.5,66 162.5,57.7 ccw(c165.5,57.7) 165.5,54.7 188.8,54.7 ccw(c188.8,57.7) 191.8,57.7 191.8,64.8 ccw(c189.8,64.8) 190.645,66.613 ; 189.422,67.829 ccw(c192,69.2) 190.674,66.598 ; 190.645,5.387 ccw(c189.8,7.2) 191.8,7.2 ; 162.5,43.1 ccw(c165.5,43.1) 165.5,40.1 188.8,40.1 ccw(c188.8,43.1) 191.8,43.1 191.8,48.7 ccw(c188.8,48.7) 188.8,51.7 165.5,51.7 ccw(c165.5,48.7) 162.5,48.7 162.5,43.1